# Altium PCB CH32M007E8U_FAN_R0.PcbDoc
Units mil, origin at the board's own origin, x right, y up, seen from the top; angles counter-clockwise.
Board outline 2119 x 1187.07 mil, 2 copper layers (Top Layer, Bottom Layer); 49 components, 34 nets, 149 pads, 107 vias.
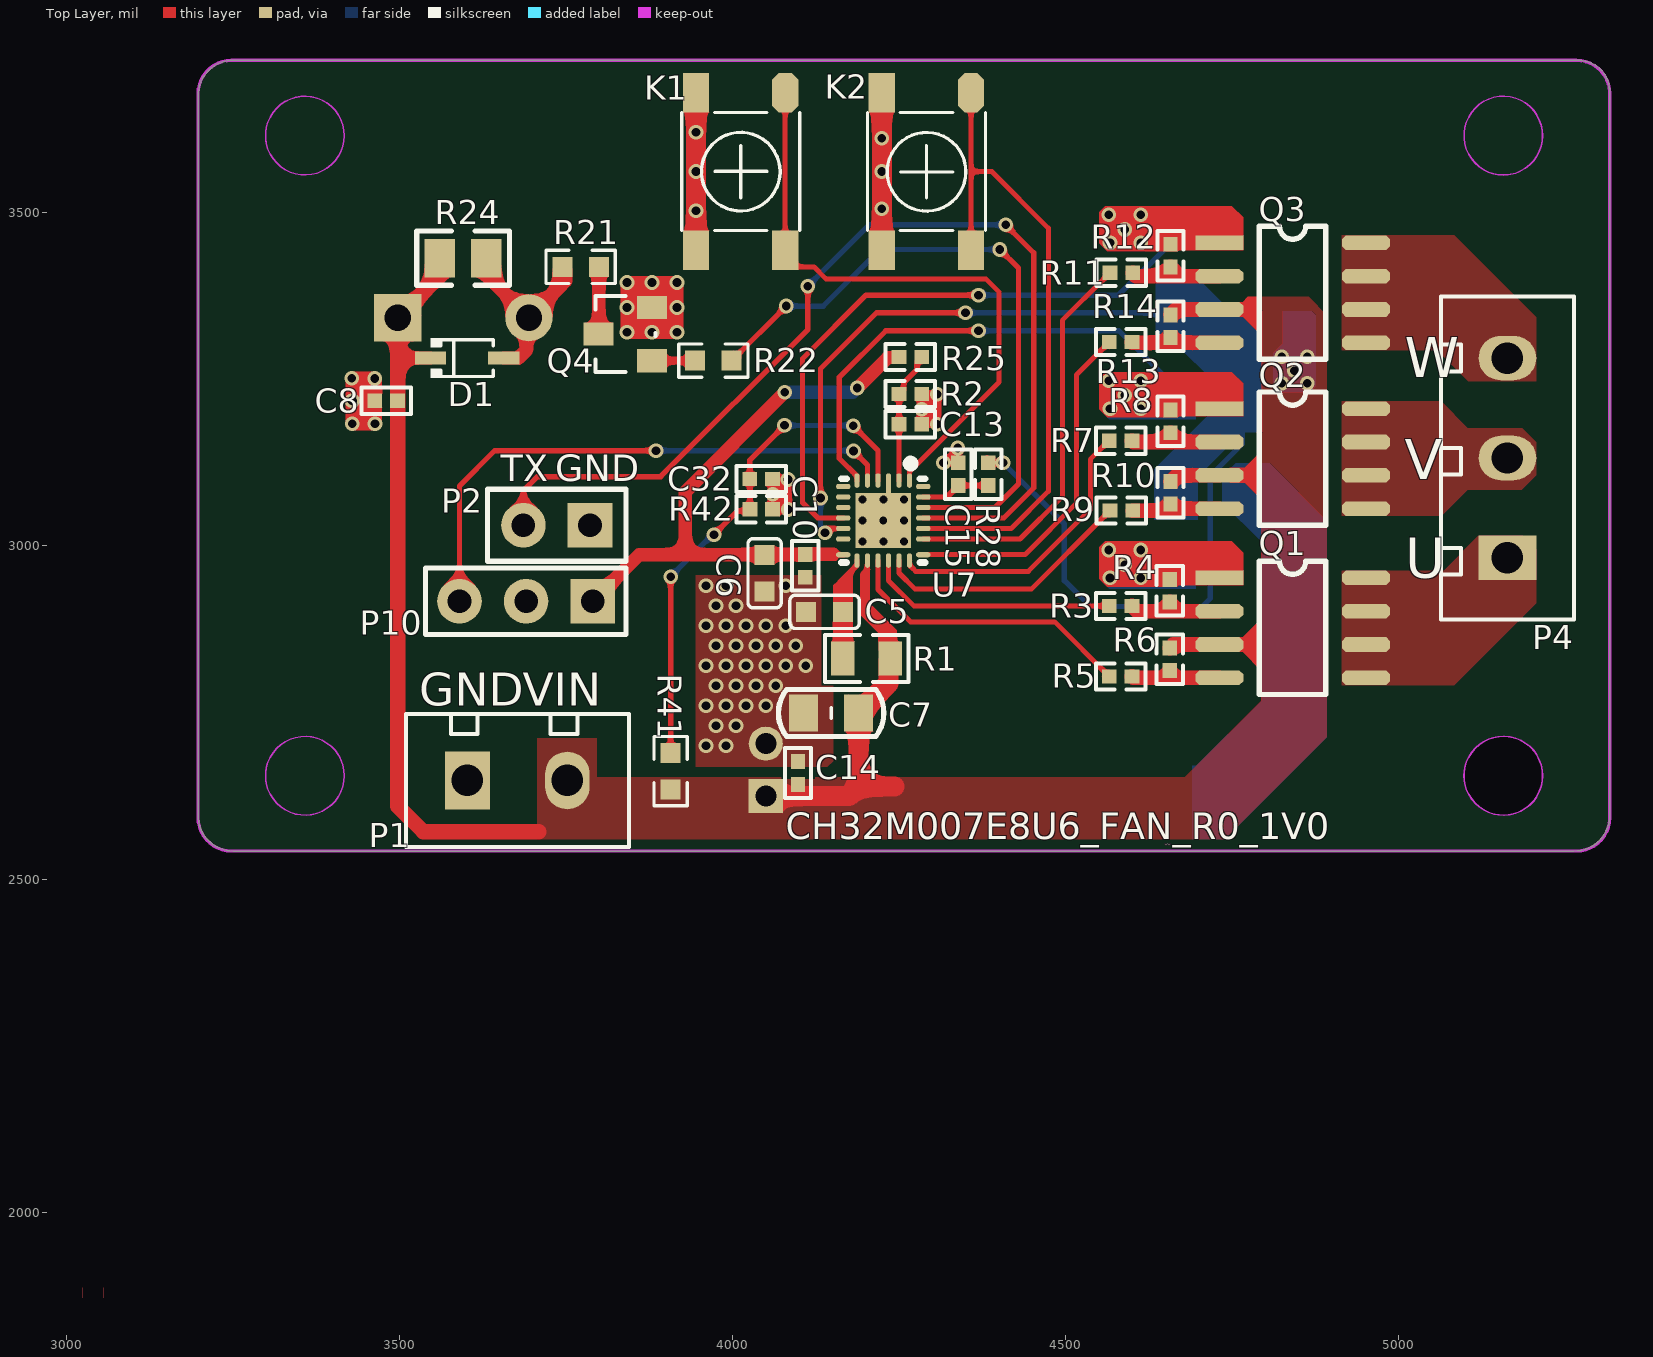
[diagram p0: Top Layer view]
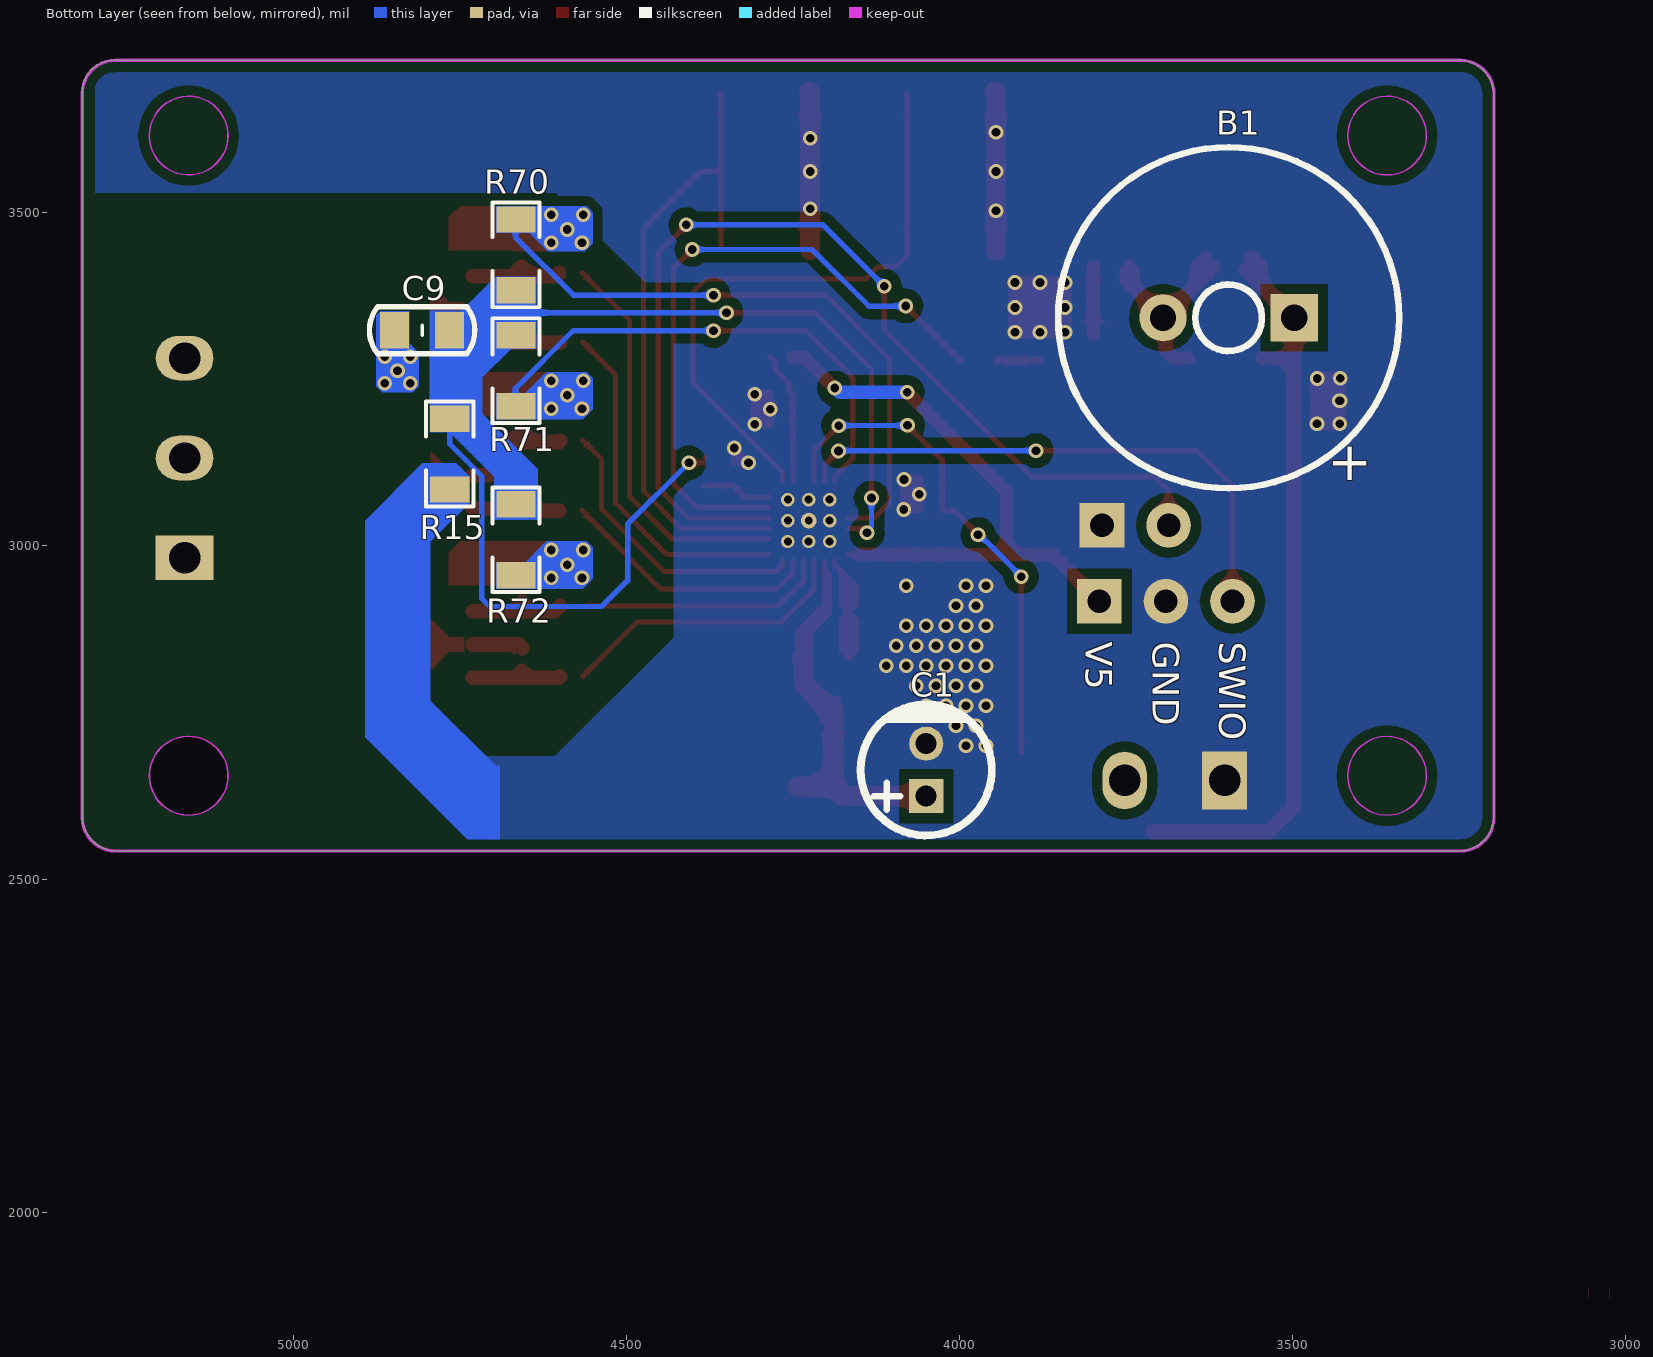
[diagram p1: Bottom Layer view, seen from below]

## Layer stack, top to bottom
Top Solder: solder mask 0.4, Solder Resist, Dk 3.5
Top Layer: signal copper 1.4
Dielectric1: dielectric 12.6, FR-4, Dk 4.8
Bottom Layer: signal copper 1.4
Bottom Solder: solder mask 0.4, Solder Resist, Dk 3.5

## Board outline
3197.63,2594.97 ccw(c3250.64,2595) 3250.64,2541.99 3250.64,2542 5263.61,2542 5263.61,2541.99 ccw(c5263.61,2595) 5316.62,2595 5316.62,3681.04 ccw(c5268.61,3681.04) 5268.61,3729.05 3250.64,3729.05 ccw(c3250.64,3676.04) 3197.63,3676.04
cut-out: 5097.49,2655.17 ccw(c5156.55,2655.17) 5156.55,2596.12 ccw(c5156.55,2655.17) 5215.6,2655.17 ccw(c5156.55,2655.17) 5156.55,2714.23 ccw(c5156.55,2655.17)

## Design rules (kind name [scope] priority, off if disabled: settings)
Clearance Clearance_1 [InPolygon] p1: gap=15 ignorepadtopadclearanceinfootprint=FALSE except(0: Arc-Hole Track-Hole SMDPad-Hole THPad-Hole Via-Hole Fill-Hole Poly-Hole Region-Hole Text-Hole)
Clearance [All] p2: gap=6 ignorepadtopadclearanceinfootprint=FALSE except(0: Arc-Hole Track-Hole SMDPad-Hole THPad-Hole Via-Hole Fill-Hole Poly-Hole Region-Hole Text-Hole)
DiffPairsRouting [All] p1: maxlimit=10 minlimit=10 mostfreqgap=10 toplayer_minwidth=15 toplayer_maxwidth=15 toplayer_prefwidth=15 bottomlayer_minwidth=15 bottomlayer_maxwidth=15 bottomlayer_prefwidth=15 substack1={825F90D1-6AF3-4863-A212-544127A36AD2} toplayer_{825f90d1-6af3-4863-a212-544127a36ad2}_minwidth=15 toplayer_{825f90d1-6af3-4863-a212-544127a36ad2}_maxwidth=15 toplayer_{825f90d1-6af3-4863-a212-544127a36ad2}_prefwidth=15 bottomlayer_{825f90d1-6af3-4863-a212-544127a36ad2}_minwidth=15 bottomlayer_{825f90d1-6af3-4863-a212-544127a36ad2}_maxwidth=15 bottomlayer_{825f90d1-6af3-4863-a212-544127a36ad2}_prefwidth=15 maxuncoupledlength=500
PolygonConnect [All] p1: connectstyle=Direct reliefconductorwidth=10 reliefentries=4 polygonreliefangle="90 Angle" airgapwidth=10
RoutingVias [All] p1: holewidth=13 width=22 viastyle="Through Hole" minholewidth=13 minwidth=22 maxholewidth=28 maxwidth=50
SolderMaskExpansion [All] p1: expansion=4 istentingtop=FALSE
Width [All] p1: maxlimit=100 minlimit=6 preferedwidth=10 substack1={825F90D1-6AF3-4863-A212-544127A36AD2} minimp=50.000000 maximp=50.000000 favimp=50.000000
29 further rules are at their usual default settings.

## Components (designator, comment, footprint, x,y, rotation, side; value= is the part's Value field where it differs from the comment)
B1 "BUZZER" M_BUZZER12550 3594.93,3343.42 r0 bottom
C1 "47uF/35V" M_C_RB_D5F2 4048,2664 r90 bottom
C5 "2.2uF/25V" M_C0603 4138,2899 r180 top
C6 "10uF" M_C0603 4050,2959 r270 top
C7 "10uF/25V" M_C0805 4150.93,2750 r180 top
C8 "0.1uF/25V" M_C0402- 3479.14,3217.63 r180 top
C9 "1uF/50V" M_C0805 4809.52,3323 r180 bottom
C10 "0.1uF" M_C0402- 4109.37,2969.14 r270 top
C13 "0.1uF" M_C0402- 4267.78,3183.11 r0 top
C14 "0.1uF/50V" M_C0402- 4098,2660 r90 top
C15 "1nF" M_C0402- 4339,3107 r270 top
C32 "0.1uF" M_C0402- 4043.69,3100.93 r0 top
D1 "4148" SOD-323 3601.52,3282 r180 top
K1 "KH-6X6X8H-STM" KEY2-SMD 4010.13,3561.22 r270 top
K2 "KH-6X6X8H-STM" KEY2-SMD 4288.98,3561.11 r270 top
P1 "POWER" WJ15EDGRC3.81-2 3677,2643 r0 top
P2 "TXD" HDR2.54-LI-2P 3786,3031 r270 top
P4 "MHDR1X3" WJ15EDGRC3.81-3 5163,3132 r90 top
P10 "SWD" HDR2.54-LI-3P 3640,2917 r270 top
Q1 "NP4606SR" SOP8 4730.52,2952 r270 top
Q2 "NP4606SR" SOP8 4730.52,3206 r270 top
Q3 "NP4606SR" SOP8 4730.52,3455 r270 top
Q4 "S8050" SOT23 3839,3318 r90 top
R1 "100 Ω" M_R0805- 4201,2831 r0 top
R2 "1k 1%" M_R0402- 4266.14,3226.63 r180 top
R3 "22 Ω" M_R0402- 4581.65,2908.63 r180 top
R4 "20k" M_R0402- 4657.52,2932 r270 top
R5 "22 Ω" M_R0402- 4581.65,2802.63 r180 top
R6 "20k" M_R0402- 4657.52,2829 r270 top
R7 "22 Ω" M_R0402- 4581.65,3156.63 r180 top
R8 "20k" M_R0402- 4658.52,3186 r270 top
R9 "22 Ω" M_R0402- 4582.65,3051.63 r180 top
R10 "20k" M_R0402- 4658.52,3079 r270 top
R11 "22 Ω" M_R0402- 4582.65,3408.63 r180 top
R12 "20k" M_R0402- 4658.52,3435 r270 top
R13 "22 Ω" M_R0402- 4581.65,3304.63 r180 top
R14 "20k" M_R0402- 4658.52,3329 r270 top
R15 "0R100/1W" M_R1206- 4766,3136.85 r90 bottom
R21 "100Ω" M_R0603 3799.02,3420 r180 top
R22 "1kΩ" M_R0603 3944,3277 r0 top
R24 "2KΩ" M_R0805 3628.52,3432 r180 top
R25 "15k 1%" M_R0402- 4266,3282 r180 top
R28 "10k" M_R0402- 4385,3107 r270 top
R41 "4.7k 1%" M_R0603 3906,2689 r270 top
R42 "1k 1%" M_R0402- 4042.22,3053.63 r180 top
R70 "0R100/1W" M_R1206- 4666.52,3436 r90 bottom
R71 "0R100/1W" M_R1206- 4664.52,3264 r270 bottom
R72 "0R100/1W" M_R1206- 4664.52,3010.3 r270 bottom
U7 "CH32M007E8U6" QFN26C_3X3 4226.12,3038.04 r180 top

## Footprints (in the part's own frame and the unit in brackets; to place one, negate y for a bottom-side part, rotate by r counter-clockwise, add the part's x,y. Pads: shape width x height; smd on the part's side, far side on the other; paste and mask are expansions set on the pad)
HDR2.54-LI-2P [mm]
  rect 1.7x1.7 hole 0.9: 1(0,0)
  round 1.7 hole 0.9: 2(0,-2.54)
  silkscreen extent -1.37,-3.91 1.37,1.37, body extent -1.27,-3.81 1.27,1.27, height 8.5
HDR2.54-LI-3P [mm]
  rect 1.7x1.7 hole 0.9: 1(0,3.81)
  round 1.7 hole 0.9: 2(0,1.27) 3(0,-1.27)
  silkscreen extent -1.27,-2.57 1.27,5.08
KEY2-SMD [mm]
  oct 1.5x1 smd: 1(-3.023,1.749)
  rect 1.5x1 smd: 2(2.977,1.749) 3(-3.023,-1.651) 4(2.977,-1.651)
  silkscreen extent -2.27,-2.2 2.23,2.3
M_BUZZER12550 [mm]
  rect 1.8x1.8 hole 1: 1(-2.477,0.023)
  round 1.8 hole 1: 2(2.523,0.023)
  silkscreen extent -6.48,-6.48 6.52,6.52
M_C0402- [mm]
  rect 0.566x0.54 smd mask+0.051: 1(-0.454,-0.009) 2(0.412,-0.009)
  silkscreen extent -0.97,-0.51 0.92,0.49
M_C0603 [mil]
  rect 30x30 smd: 1(-27.5,-2) 2(27.5,-2)
  silkscreen extent -52,-27 52,23
M_C0805 [mm]
  rect 1.1x1.4 smd: 1(-0.972,0.019) 2(1.128,0.019)
  silkscreen extent -1.93,-0.88 2.09,0.92
M_C_RB_D5F2 [mm]
  rect 1.3x1.3 hole 0.8: 1(-1.005,0.045)
  round 1.3 hole 0.8: 2(0.995,0.045)
  silkscreen extent -2.5,-2.45 2.49,2.55
M_R0402- [mm]
  rect 0.566x0.54 smd mask+0.051: 1(-0.454,-0.035) 2(0.412,-0.035)
  silkscreen extent -0.97,-0.53 0.92,0.46
M_R0603 [mil]
  rect 30x30 smd: 1(-0.5,1) 2(54.5,1)
  silkscreen extent -25,-24 79,26
M_R0805 [mm]
  rect 1.16x1.47 smd: 1(-0.051,0) 2(1.729,0)
  silkscreen extent -0.93,-1.04 2.61,1.03
M_R0805- [mm]
  rect 0.9x1.3 smd: 1(-0.9,0) 2(0.9,0)
  silkscreen extent -1.57,-0.89 1.6,0.89, body extent -1,-0.63 1,0.63, height 0.5
M_R1206- [mm]
  rect 1x1.5 smd: 1(-1.325,-0.025) 2(1.375,-0.025)
  silkscreen extent -1.97,-0.93 2.03,0.87
QFN26C_3X3 [mm]
  rect 2.1x2.1 smd mask+0.051: 0(0,0)
  round 0.6 hole 0.3 mask+0.051: 0(0,0)
  oval 0.2x0.55 smd mask+0.051: 1(-1,-1.525) 2(-0.6,-1.525) 4(0.2,-1.525) 5(0.6,-1.525) 6(1,-1.525) 14(1,1.525) 15(0.6,1.525) 16(0.2,1.525) 17(-0.2,1.525) 18(-0.6,1.525) 19(-1,1.525)
  oval 0.2x1 smd mask+0.051: 3(-0.2,-1.3)
  oval 0.55x0.2 smd mask+0.051: 7(1.525,-1.3) 8(1.525,-0.9) 9(1.525,-0.5) 10(1.525,-0.1) 11(1.525,0.3) 12(1.525,0.7) 13(1.525,1.3) 20(-1.525,1.3) 21(-1.525,0.7) 22(-1.525,0.3) 23(-1.525,-0.1) 24(-1.525,-0.5) 25(-1.525,-0.9) 26(-1.525,-1.3)
  silkscreen extent -1.6,-2.33 1.6,1.6
SOD-323 [mil]
  rect 47.24x20 smd: 1(-55,0) 2(55,0)
  silkscreen extent -39,-30 55,30
SOP8 [mil]
  rect 22x72 smd: 1(0,0)
  oct 22x72 smd: 2(50,0) 3(100,0) 4(150,0) 5(150,220) 6(100,220) 7(50,220) 8(0,220)
  silkscreen extent -25,60 175,160
SOT23 [mil]
  rect 35x45 smd: 1(-40,-40) 2(40,-40) 3(0,40)
  silkscreen extent -57,-45 57,45
WJ15EDGRC3.81-2 [mm]
  rect 1.7x2.2 hole 1.2: 1(-1.905,0.127)
  oval 1.7x2.2 hole 1.2: 2(1.905,0.127)
  silkscreen extent -4.25,-2.41 4.25,2.67
WJ15EDGRC3.81-3 [mm]
  rect 1.7x2.2 hole 1.2: 1(-3.81,0)
  oval 1.7x2.2 hole 1.2: 2(0,0) 3(3.81,0)
  silkscreen extent -6.15,-2.54 6.15,2.54

## Part data
C1: library part "CAPACITOR POL_2", "Capacitor"
C5 C6 C7 C8 C9 C10 C13 C14 C15 C32: library part "Cap Semi", "Capacitor (Semiconductor SIM Model)", LatestRevisionDate=17-Jul-2002, LatestRevisionNote="Re-released for DXP Platform.", PackageReference=C0805, Published=8-Jun-2000, Publisher="Altium Limited"
D1: library part "Diode 1N4148", "High Conductance Fast Diode", Code_JEDEC=DO-204-AH, ComponentLink1Description="Manufacturer Link", ComponentLink1URL=http://www.fairchildsemi.com/, ComponentLink2Description=Datasheet, ComponentLink2URL=http://www.fairchildsemi.com/ds/1N%2F1N4148.pdf, DatasheetDocument=1997, LatestRevisionDate=17-Jul-2002, LatestRevisionNote="Re-released for DXP Platform.", PackageReference=DO-35, Published=8-Jun-2000, Publisher="Altium Limited"
K1 K2: Contact Current=50mA, IP Rating=-, JLCPCB Part Class="Extended Part", Voltage Rating (DC)=12V, Add into BOM=yes, Convert to PCB=yes, Datasheet=https://atta.szlcsc.com/upload/public/pdf/source/20210608/C2837534_94EAC7D8AFBB996E2814FACF50FEEF85.pdf, Device=KH-6X6X8H-STM, LCSC Part Name=KH-6X6X8H-STM, Manufacturer Part=KH-6X6X8H-STM, Mechanical Life=80000, Name==''Part, Operating Force=-, Operating Temperature=-, Power Rating=-, Supplier=LCSC, Supplier Footprint=SMD, Supplier Part=C2837534, Switch Height=-, Switch Length=6mm, Switch Width=6mm, Symbol=KH-6X6X8H-STM, Voltage Rating (AC)=-, With Lamp=-
P1 P2: library part 2PIN
P4: "Header, 3-Pin", LatestRevisionDate=17-Jul-2002, LatestRevisionNote="Re-released for DXP Platform.", Publisher="Altium Limited"
P10: library part 3PIN
Q1 Q2 Q3: library part NP9926BSR-G, Continuous Drain Current (Id)=6A, Drain Source Voltage (Vdss)=20V, Gate Threshold Voltage (Vgs(th)@Id)=700mV@250uA, Input Capacitance (Ciss@Vds)=900pF@10V, JLCPCB Part Class="Extended Part", Power Dissipation (Pd)=1.25W, Reverse Transfer Capacitance (Crss@Vds)=100pF@10V, Add into BOM=yes, Convert to PCB=yes, Datasheet=https://atta.szlcsc.com/upload/public/pdf/source/20220426/45EDAE8AA532D945771DBC41E7CE2370.pdf, Device=NP9926BSR-G, Manufacturer Part=NP9926BSR-G, Supplier=LCSC, Supplier Footprint=SOP-8, Supplier Part=C2991134, Symbol=NP9926BSR-G, Total Gate Charge (Qg@Vgs)=12nC@4.5V
Q4: library part NPN1
R1 R2 R3 R4 R5 R6 R7 R8 R9 R10 R11 R12 R13 R14 R15 R21 R22 R24 R25 R28 R41 R42 R70 R71 R72: library part Res2, "Resistor", LatestRevisionDate=17-Jul-2002, LatestRevisionNote="Re-released for DXP Platform.", PackageReference=AXIAL-0.4, Published=8-Jun-2000, Publisher="Altium Limited"
U7: "RISC-V MCU, 48MHz, OPA/CMP/UART/I2C, 24V P/NMOS gate driver for motor"

## Via types
v1: diameter 22, hole 13, Top Layer to Bottom Layer, tented both sides, 99 vias
v2: diameter 20, hole 12, Top Layer to Bottom Layer, tented both sides, 8 vias

## Nets (pads, with @x,y where several pads share a name; then routed paths per layer and width w, separated by ;. In a path a pad name is that pad's centre, name@x,y a point inside that pad or via, vN(x,y) a via of type N, cw(c..) or ccw(c..) an arc to the next point about the centre after c; other vN are vias at no path point)
ADC_Vbus: C32.1 R41.1 R42.2 U7.4 | length 774
  Top Layer w8: R41.1 v1(3907,2954) ; v1(3972,3017) 4007.55,3052.55 4023.55,3052.55 R42.2 4025.91,3055.09 4025.91,3100.48 C32.1 4025.82,3128.82 v1(4078,3181) ; v1(4181,3180.5) 4218.24,3143.26 U7.4
  Bottom Layer w8: v1(3907,2954) 3970,3017 v1(3972,3017) ; v1@4078,3180.75 4180.75,3180.75 v1(4181,3180.5)
BEEP_CTRL: R22.2 U7.24 | length 992.8
  Top Layer w8: R22.2 v1(4080.75,3360.25) ; U7.24 4393.72,3057.72 4429,3093 4429,3417 v1(4401,3445)
  Bottom Layer w8: v1@4080.75,3360 4136,3360 4221,3445 v1(4401,3445)
CMP1_N0: C15.2 R28.2 U7.25 | length 104.9
  Top Layer w8: U7.25 4321.82,3073.47 4338.63,3090.28 C15.2 R28.2
CMP1_P0: C13.1 R2.2 R25.1 U7.2 | length 200
  Top Layer w8: U7.2 4249.8,3098.14 4249.8,3182.61 C13.1 R2.2 4250.43,3228 4257.06,3234.63 4257.06,3245.05 4276.73,3264.73 4276.73,3276.74 4283.36,3283.37 R25.1
GND: C1.2 C5.2 C6.2 C7.2 C8.2 C10.2 C13.2 C14.2 C15.1 C32.2 K1.3 K1.4 K2.3 K2.4 P1.1 P2.1 P10.2 Q4.2 R2.1 R15.1 R42.1 U7.0 U7.3 | length 1677.5
  Top Layer w8: v1(4316.49,3124.86) 4316.49,3125.18 4338,3146.68 v1(4338,3147) 4338.31,3146.68 C15.1@4338.31,3125.18 ; v1@4316.81,3125.18 C15.1@4338.31,3125.18 ; C15.1 C15.1@4338.31,3125.18
  Top Layer w12: C32.2 C32.2@4060.08,3100.39 ; v1(4083.55,3054.7) v1@4083.49,3054.76 ; C32.2@4060.08,3100.39 R42.1 4060.32,3054.76 v1@4083.49,3054.76 ; C32.2@4060.08,3100.39 4060.28,3100.2 4082.8,3100.2 v1(4083.18,3099.82) 4083.36,3099.64 4083.36,3054.89 v1@4083.49,3054.76 ; 4295.63,3182.7 4295.63,3227.96 ; 4295.63,3182.7 C13.2 C13.2 v1(4284,3205.37) R2.1 R2.1 4295.63,3227.96 ; 4295.63,3182.7 4307.21,3182.7 v1(4307.26,3182.65) v1(4307.26,3227.91) 4307.21,3227.96 4295.63,3227.96
  Top Layer w20: v1(3428.55,3251.78) v1@3428.74,3251.6 ; v1@3428.74,3251.6 3428.84,3251.49 3428.84,3183.92 v1(3429.14,3183.63) v1(3463.14,3183.63) 3463.03,3183.74 3463.03,3251.31 v1(3462.92,3251.41) 3462.74,3251.6 v1@3428.74,3251.6 ; v1(3841.52,3358) Q4.2@3860.26,3358 ; v1(3841.52,3358) v1(3841.52,3320.52) 3860.26,3320.52 ; v1(3841.52,3358) v1(3841.52,3395.48) 3860.26,3395.48 ; 3860.26,3320.52 v1(3879,3320.52) ; 3860.26,3320.52 Q4.2@3860.26,3358 ; Q4.2@3860.26,3358 Q4.2 ; Q4.2@3860.26,3358 3860.26,3395.48 ; 3860.26,3395.48 v1(3879,3395.48) ; v1(3879,3320.52) 3897.74,3320.52 ; v1(3879,3320.52) Q4.2 ; Q4.2 Q4.2@3897.74,3358 ; Q4.2 v1(3879,3395.48) ; v1(3879,3395.48) 3897.74,3395.48 ; 3897.74,3320.52 v1(3916.48,3320.52) v1(3916.48,3358) ; 3897.74,3320.52 Q4.2@3897.74,3358 ; Q4.2@3897.74,3358 v1(3916.48,3358) ; Q4.2@3897.74,3358 3897.74,3395.48 ; 3897.74,3395.48 v1(3916.48,3395.48) v1(3916.48,3358)
  Top Layer w30: K1.4@3945.16,3444.02 v1(3945.16,3562.13) 3945.16,3680.24 K1.3@3947.14,3682.22 ; K2.4 v1(4224,3562) K2.3 K2.3@4225.98,3682.09
  other v1: 3960,2700 3990,2700 3975,2730 4005,2730 3960,2760 3990,2760 4020,2760 4050,2760 3975,2790 4005,2790 4035,2790 4065,2790 3960,2820 3990,2820 4020,2820 4050,2820 4080,2820 4110,2820 3975,2850 4005,2850 4035,2850 4065,2850 4095,2850 3960,2880 3990,2880 4020,2880 4050,2880 4080,2880 3975,2910 4005,2910 3960,2940 3990,2940 4080,2940 4060.12,3077.66 3428.55,3217.78 3429.51,3218 3945.16,3503.07 4223.98,3506.11 4223.98,3612.11 3945.16,3621.18
  other v2: 4194.62,3006.54 4226.12,3006.54 4257.62,3006.54 4194.62,3038.04 4257.62,3038.04 4194.62,3069.54 4226.12,3069.54 4257.62,3069.54
I1_shunt: C9.2 R15.2 R28.1 R70.1 R71.1 R72.1 U7.11 | length 1735.6
  Top Layer w8: v1(4132,3072) 4132,3266 4216,3350 v1(4349.63,3350) ; v1(4138.61,3019.61) 4145.23,3026.23 U7.11 ; R28.1@4381.86,3132.37 R28.1@4381.93,3132.44 ; R28.1 v1(4405.86,3124.86)
  Bottom Layer w8: v1(4132,3072) 4132,3030.02 4138.61,3023.4 v1(4138.61,3019.61) ; v1(4349.63,3350) 4650.99,3350 4665.52,3350 ; v1(4405.86,3124.86) 4406.14,3124.86 4498,3033 4498,2948 4537,2909 4705,2909 4717,2921 4717,3105 4765,3153 R15.2
  Bottom Layer w30: R71.1@4650.99,3311 R71.1@4650.99,3316.15 ; 4650.99,3350 4650.99,3379.17 4655.67,3383.85 R70.1 ; R71.1 4665.52,3350 ; R70.1@4675.36,3383.85 4680.04,3379.17 4680.04,3350
KEY1: K1.1 K1.2 U7.1 | length 927.4
  Top Layer w7.5: K1.1 K1.2 4079,3434.94 4094.94,3419 4122.16,3419 4139.91,3401.25 4139.91,3401 4380,3401 4400,3381 4400,3246 4265.55,3111.55 4265.55,3098.15 U7.1
KEY2: K2.1 K2.2 U7.22 | length 993.5
  Top Layer w7.5: U7.22 4418.23,3026.23 4474,3082 4474,3477 4389,3562 4357.86,3562 ; K2.2 4357.86,3562 ; K2.1 4357.86,3562
M1_CH1_H: R5.2 U7.16 | length 444.6
  Top Layer w7.5: U7.16 4218.25,2934.75 4267,2886 4483.44,2886 R5.2
M1_CH1_L: R3.2 U7.17 | length 377.2
  Top Layer w7.5: U7.17 4234.07,2977.93 4234.07,2947.93 4272,2910 R3.2
M1_CH2_H: R9.2 U7.18 | length 394.7
  Top Layer w7.5: U7.18 4249.75,2959.25 4274,2935 4448.44,2935 4559.05,3045.61 4559.05,3046.12 4565.93,3053 R9.2
M1_CH2_L: R7.2 U7.19 | length 435.7
  Top Layer w7.5: U7.19 4265.5,2971.21 4274.71,2962 4444,2962 4537,3055 4537,3130.07 4564.93,3158 R7.2
M1_CH3_H: R13.2 U7.20 | length 524.6
  Top Layer w7.5: U7.20 4438.86,2986.86 4516,3064 4516,3256.56 4558.05,3298.61 4558.05,3299.12 4564.93,3306 R13.2
M1_CH3_L: R11.2 U7.21 | length 601
  Top Layer w7.5: U7.21 4431.48,3010.48 4495,3074 4495,3338.56 4559.05,3402.61 4559.05,3403.12 4565.93,3410 R11.2
M1_Iu: Q1.1 R4.1 R72.2
  other v1: 4566.52,2952 4612.52,2952 4588.52,2972 4564.52,2994 4612.52,2994
M1_Iv: Q2.1 R8.1 R71.2 U7.6 | length 838.2
  Top Layer w8: U7.6 4186.74,3104.84 4160,3131.59 4160,3253 4230,3323 v1(4369,3323)
  Top Layer w22: R8.1 4657.38,3203.86 4659.52,3206 Q2.1
  Bottom Layer w8: v1(4369,3323) 4580,3323 4666.52,3236.48 R71.2@4666.52,3209.85
  other v1: 4566.52,3206 4612.52,3206 4588.52,3226 4564.52,3248 4612.52,3248
M1_Iw: Q3.1 R12.1 R70.2 U7.10 | length 1086.5
  Top Layer w8: U7.10 4128.02,3041.98 4105,3065 4105,3281 4200.5,3376.5 v1(4369,3376.5)
  Top Layer w22: R12.1 4657.38,3452.86 4659.52,3455 Q3.1
  Bottom Layer w8: v1(4369,3376.5) 4579.5,3376.5 4666.02,3463.02 R70.2@4666.02,3489.65 ; R70.2@4636.52,3475 4650.37,3475 R70.2 R70.2@4666.02,3489.65 ; R70.2@4686.52,3475 4680.66,3475 R70.2@4666.02,3489.65
  other v1: 4566.52,3455 4612.52,3455 4588.52,3475 4564.52,3497 4612.52,3497
M1_U: P4.1 Q1.5 Q1.6 Q1.7 Q1.8
M1_V: P4.2 Q2.5 Q2.6 Q2.7 Q2.8
M1_W: P4.3 Q3.5 Q3.6 Q3.7 Q3.8
NetB1_2: B1.2 D1.1 R21.2 R24.1 | length 375
  Top Layer w20: R24.1@3618.52,3418.26 3643.35,3393.43 ; R24.1 3643.35,3419.17 3643.35,3393.43 ; D1.1 3678.81,3282 3690.53,3293.72 3690.53,3338.76 B1.2 ; 3643.35,3393.43 B1.2 ; B1.2 3739.52,3387.75 ; 3739.52,3387.75 3749.52,3397.75 3749.52,3414 R21.2 3739.52,3414 3739.52,3387.75
NetC5_1: C5.1 R1.1 U7.14 | length 436
  Top Layer w8: U7.14 4186.76,2971.24 4176.38,2960.86 ; C5.1 C5.1@4165.57,2900.93 ; C5.1 4154.5,2890 4154.5,2842.07 R1.1 ; C5.1 C5.1@4166,2901.5 ; C5.1 4155,2911.5 4155,2939.48 4166,2950.48 ; R1.1 4176.5,2841.93 4176.5,2890 C5.1@4165.57,2900.93 ; R1.1 C5.1@4165.57,2900.93 ; C5.1@4166,2901.5 4176.38,2911.88 4176.38,2960.86 ; C5.1@4166,2901.5 4166,2950.48 ; 4166,2950.48 4176.38,2960.86
NetQ1_2: Q1.2 R3.1 R4.2 | length 190.1
  Top Layer w22: R3.1 4599.52,2909.76 4607.28,2902 4642.13,2902 ; 4686.32,2902 4670.17,2902 ; Q1.2 4670.17,2902 ; 4642.13,2902 4670.17,2902 ; 4642.13,2902 4655.91,2915.78 R4.2 4656.38,2915.78 4670.17,2902
NetQ1_4: Q1.4 R5.1 R6.2 | length 167.3
  Top Layer w22: R5.1 4599.52,2803.76 4601.28,2802 4645.13,2802 ; 4671.52,2802 4667.17,2802 ; Q1.4 4667.17,2802 ; 4645.13,2802 4655.91,2812.78 R6.2 4656.38,2812.78 4667.17,2802 ; 4645.13,2802 4667.17,2802
NetQ2_2: Q2.2 R7.1 R8.2 | length 187.1
  Top Layer w22: R7.1 4599.52,3157.76 4601.28,3156 4643.13,3156 ; 4686.82,3156 4671.17,3156 ; Q2.2 4671.17,3156 ; 4643.13,3156 4671.17,3156 ; 4643.13,3156 4656.91,3169.78 R8.2 4657.38,3169.78 4671.17,3156
NetQ2_4: Q2.4 R9.1 R10.2 | length 164.5
  Top Layer w22: R9.1 R10.2@4647.13,3053 ; 4673.52,3056 R10.2@4664.17,3056 ; Q2.4 R10.2@4664.17,3056 ; R10.2@4647.13,3053 4651.58,3053 4654.58,3056 R10.2@4664.17,3056 ; R10.2@4647.13,3053 4656.91,3062.78 R10.2 4657.38,3062.78 R10.2@4664.17,3056
NetQ3_2: Q3.2 R11.1 R12.2 | length 187.3
  Top Layer w22: R11.1 4600.52,3409.76 4605.28,3405 4643.13,3405 ; 4686.82,3405 4671.17,3405 ; Q3.2 4671.17,3405 ; 4643.13,3405 4656.91,3418.78 R12.2 4657.38,3418.78 4671.17,3405 ; 4643.13,3405 4671.17,3405
NetQ3_4: Q3.4 R13.1 R14.2 | length 162.4
  Top Layer w22: R13.1 4599.52,3305.76 4600.28,3305 R14.2@4649.13,3305 ; 4673.52,3305 R14.2@4665.17,3305 ; Q3.4 R14.2@4665.17,3305 ; R14.2@4649.13,3305 4656.91,3312.78 R14.2 4657.38,3312.78 R14.2@4665.17,3305 ; R14.2@4649.13,3305 R14.2@4665.17,3305
NetQ4_1: Q4.1 R22.1 | length 64.5
  Top Layer w12: Q4.1 R22.1
NetQ4_3: Q4.3 R21.1 | length 101.9
  Top Layer w20: R21.1@3798.5,3416.98 R21.1@3799,3417.48 ; Q4.3 3799.26,3318.26 3799.26,3418.74 R21.1
SWIO: P10.3 U7.5 | length 839.8
  Top Layer w8: P10.3 3590,3090 3643,3143 v1(3885,3143) ; v1(4181.5,3142.5) 4202.43,3121.57 4202.43,3098.14 U7.5
  Bottom Layer w8: v1(3885,3143) 4181,3143 v1(4181.5,3142.5)
UART1_TX: P2.2 U7.23 | length 1576.2
  Top Layer w8: P2.2 3686,3083 3707,3104 3892,3104 4113,3325 v1(4113,3390) ; U7.23 4406.98,3041.98 4452,3087 4452,3440 v1(4410,3482)
  Bottom Layer w8: v1(4113,3390) 4205,3482 v1(4410,3482)
V5: C6.1 C10.1 P10.1 R25.2 U7.13 | length 1021.6
  Top Layer w8: C10.1@4109.08,2986.92 U7.13@4159.25,2986.92 ; C10.1@4109.08,2986.92 4114.46,2981.54 4154,2981.54 U7.13@4159.32,2986.86 ; C10.1@4109.08,2986.92 C10.1 4109,2987.37 4115.63,2994 4152.17,2994 U7.13@4159.25,2986.92 ; U7.13@4159.25,2986.92 U7.13@4159.32,2986.86 ; U7.13@4159.25,2986.92 4166.02,2986.92 U7.13 U7.13@4159.32,2986.86
  Top Layer w20: P10.1 3860,2987 3929,2987 ; v1(4078.5,3230.5) 3929,3081 3929,2987 ; C10.1 3929,2987 ; v1(4187,3237) 4232.74,3282.74 4249.15,3282.74 R25.2
  Bottom Layer w20: v1(4078.5,3230.5) 4180.5,3230.5 v1(4187,3237)
Vin: B1.1 C1.1 C7.1 C8.1 C9.1 C14.1 D1.2 P1.2 Q1.3 Q2.3 Q3.3 R1.2 R6.1 R10.1 R14.1 R24.2 R41.2 U7.15 | length 2258.9
  Top Layer w7.5: U7.15 4202.5,2965 ; 4195,2909 4195,2898 4222.47,2870.53 4222.47,2844.97 R1.2@4223,2844.43 ; 4195,2909 4223,2881 R1.2@4223,2844.43 ; 4195,2909 4195,2957.5 4202.5,2965 ; 4202.5,2965 4202.5,2912.5 4236.43,2878.57 ; R1.2@4223,2844.43 R1.2 ; R1.2 4243,2837.57 4243,2872 4236.43,2878.57 ; R1.2 4236.43,2878.57
  Top Layer w20: 3496,3282 3497.42,3282 D1.2 ; B1.1 B1.1@3500.52,3339.41
  Top Layer w22: R6.1 4656.38,2846.86 4661.52,2852 Q1.3 ; R10.1 4657.38,3096.86 4666.52,3106 Q2.3 ; R14.1 4657.38,3346.86 4665.52,3355 Q3.3
  Top Layer w23: B1.1@3490.79,3343.14 3493.79,3346.14 B1.1 ; R24.2 3549.1,3420.67 3549.1,3394.19 ; R24.2@3569.52,3414.6 3549.1,3394.19 ; 3709,2571 3535.67,2571 3497.42,2609.25 3497.42,3282 B1.1 ; B1.1 3549.1,3394.19
  Top Layer w30: C1.1 4174.84,2624.42 4189.21,2638.79 ; R1.2 4233.72,2828.28 4233.72,2793.76 4201.77,2761.81 4195.86,2761.81 4189.21,2755.16 C7.1 4189.21,2638.79 ; 4243.21,2638.79 4189.21,2638.79
  other v1: 4824.52,3244 4862.52,3244 4843.52,3263 4824.52,3284 4862.52,3284
pads on no net: U7.7 U7.8 U7.9 U7.12 U7.26

## Polygon pours and split planes (outlines as drawn)
Vin on Top Layer "NONET_L-01_P-001" (solid, pour order 0): 3707,2653 3707,2711 3796,2711 3796,2653 4679,2653 4793.48,2767.48 4793.54,3374.03 4864.49,3374.03 4892,3346.51 4892,2713 4739,2560 3707,2560
M1_V on Top Layer "NONET_L-01_P-001" (solid, pour order 1): 4914.52,3217 5063.51,3217 5103.51,3177 5185.52,3177 5206.52,3156 5206.52,3106 5184.51,3084 5103.51,3084 5064.51,3045 4914.52,3045
M1_W on Top Layer "NONET_L-01_P-001" (solid, pour order 2): 5206.52,3247 5206.52,3343 5083.52,3466 4914.52,3466 4914.52,3294 5057.52,3294 5104.51,3247
M1_U on Top Layer "NONET_L-01_P-001" (solid, pour order 3): 5119.51,3015 5186.52,3015 5206.52,2995 5206.52,2914 5083.52,2791 4914.52,2791 4914.52,2963 5067.52,2963
GND on Top Layer "NONET_L03_P-001" (solid, remove dead copper, pour order 10): 4150.9,2808 4133,2808 4133,2956 3945,2956 3945,2653 4127,2653 4150.99,2676.99
GND on Bottom Layer "NONET_L-01_P-001" (solid, pour order 4): 4720,2684 4607,2684 4429,2862 4429,3353 4606,3530 5296.94,3530 5296.94,3729.04 3198,3729.04 3198,2541.5 4462.52,2541 4686,2541 4720,2575

## Keep-outs
Keep-Out Layer:
  circle w2: c3358,2655 r59.18
  circle w2: c5157,2655 r59.18
  circle w2: c5157,3616 r59.18
  circle w2: c3358,3616 r59.18
  pour cut-out: 3358.12,3556.75 cw(c3358.12,3615.8) 3299.07,3615.8 cw(c3358.12,3615.8) 3358.12,3674.86 cw(c3358.12,3615.8) 3417.18,3615.8 cw(c3358.12,3615.8)
  pour cut-out: 5097.49,3615.8 ccw(c5156.55,3615.8) 5156.55,3556.75 ccw(c5156.55,3615.8) 5215.6,3615.8 ccw(c5156.55,3615.8) 5156.55,3674.86 ccw(c5156.55,3615.8)
  pour cut-out: 3358.12,2596.12 cw(c3358.12,2655.17) 3299.07,2655.17 cw(c3358.12,2655.17) 3358.12,2714.23 cw(c3358.12,2655.17) 3417.18,2655.17 cw(c3358.12,2655.17)
  pour cut-out: 3358.12,2596.12 cw(c3358.12,2655.17) 3299.07,2655.17 cw(c3358.12,2655.17) 3358.12,2714.23 cw(c3358.12,2655.17) 3417.18,2655.17 cw(c3358.12,2655.17)
  pour cut-out: 5156.55,2596.12 cw(c5156.55,2655.17) 5097.49,2655.17 cw(c5156.55,2655.17) 5156.55,2714.23 cw(c5156.55,2655.17) 5215.6,2655.17 cw(c5156.55,2655.17)
  lines w5: 3197.64,2592 ccw(c3247.64,2592) 3247.64,2542 5266.61,2542 ccw(c5266.61,2592) 5316.61,2592 5316.61,3679.04 ccw(c5266.61,3679.04) 5266.61,3729.04 3247.64,3729.04 ccw(c3247.64,3679.04) 3197.64,3679.04 3197.64,2592

## Other copper
Top Layer:
  region net GND: 4060.08,3099.73 4060.08,3055 4083.27,3055 4083.27,3099.73
  region net GND: 3841.52,3320.52 3916.48,3320.52 3916.48,3395.48 3841.52,3395.48
  region net GND: 4338.31,3146.68 4338.63,3146.37 4338.63,3124.86 4316.49,3124.86
  region net GND: 3428.55,3251.78 3428.76,3251.57 3428.76,3218 3462.92,3218 3462.92,3251.41
  region net Vin: 4202.5,2965 4195,2957.5 4195,2898 4222.47,2870.53 4222.47,2844.97 4236.43,2831 4243,2837.57 4243,2872 4202.5,2912.5
  region net NetC5_1: 4154.5,2890 4154.5,2842.07 4165.57,2831 4176.5,2841.93 4176.5,2901.38 4171.19,2906.69
  region net NetC5_1: 4155,2939.48 4155,2911.5 4165.5,2901 4176.38,2911.88 4176.38,2960.86
  region net GND: 3429.14,3183.63 3429.35,3183.84 3462.92,3183.84 3462.92,3218 3429.51,3218
  region net Vin: 4743.52,2863 4765.52,2863 4793.52,2891 4793.52,2813 4765.52,2841 4743.52,2841
  region net Vin: 4746.52,3117 4768.52,3117 4793.51,3142 4793.52,3070 4768.52,3095 4746.52,3095
  region net M1_Iw: 4562.52,3442 4550.52,3454 4550.52,3501 4559.52,3510 4749.52,3510 4766.52,3493 4766.52,3444 4669.52,3444 4667.52,3442
  region net M1_Iv: 4562.52,3193 4550.52,3205 4550.52,3252 4559.52,3261 4749.52,3261 4766.52,3244 4766.52,3195 4669.52,3195 4667.52,3193
  region net Vin: 4743.52,3366 4765.52,3366 4773.51,3374 4794,3374 4794,3315.51 4765.52,3344 4743.52,3344
  region net M1_Iu: 4562.52,2939 4550.52,2951 4550.52,2998 4559.52,3007 4749.52,3007 4766.52,2990 4766.52,2941 4669.52,2941 4667.52,2939
  region net GND: 4284,3182.74 4284.09,3182.65 4307.26,3182.65 4307.26,3227.91 4307.17,3228 4284,3228
Bottom Layer:
  region net GND: 4735,3104 4755,3124 4806,3124 4892,3038 4892,2713 4738.84,2559.84 4690,2559.84 4690,2670 4696,2670 4794,2768 4794,3006 4735,3065
  region net I1_shunt: 4635,3404 4635,3296 4673,3296 4716,3253 4716,3198.11 4633,3115.11 4633,3039 4698,3039 4698,3104 4765,3171 4795,3171 4795,3353 4747,3353 4696,3404
  region net M1_Iv: 4651.52,3229 4626.52,3254 4619.52,3261 4559.52,3261 4550.52,3252 4550.52,3205 4565.52,3190 4583.52,3190 4695.52,3190 4695.52,3229
  region net M1_Iw: 4645.52,3470 4624.52,3449 4617.52,3442 4562.52,3442 4550.52,3454 4550.52,3501 4559.52,3510 4695.52,3510 4695.52,3470
  region net Vin: 4825.52,3304 4825.52,3352 4869.52,3352 4875.52,3346 4875.52,3289 4875.51,3240 4866.52,3231 4839.52,3231 4820.52,3231 4811.52,3240 4811.52,3290
  region net M1_Iu: 4651.52,2975 4626.52,3000 4619.52,3007 4559.52,3007 4550.52,2998 4550.52,2951 4565.52,2936 4583.52,2936 4695.52,2936 4695.52,2975

## Silkscreen, mask and mechanical layers (free items; w line width, h text height)
Top Overlay:
  lines w5: 3973.49,3562.22 4051.49,3562.22 ; 4012.13,3522.68 4012.13,3600.86 ; 4252.29,3561.17 4330.46,3561.17 ; 4290.93,3522.54 4290.93,3600.54 4290.93,3522.54
  text "W" at 5009,3253 h60
  text "V" at 5009,3100 h60
  text "TX" at 3652,3097 h40
  text "GND" at 3734,3097 h40
  text "U" at 5010,2952 h60
  text "GND" at 3530,2760 h50
  text "VIN" at 3685,2760 h50
  text "CH32M007E8U6_FAN_R0_1V0" at 4080,2560 h40
  text "YYYY" at 4649,2550 h3
Bottom Overlay:
  text "SWIO" at 3610,2856 h40 r90
  text "GND" at 3710,2856 h40 r90
  text "V5" at 3810,2856 h40 r90
Mechanical 1:
  lines w5: 3197.63,2594.97 ccw(c3250.64,2595) 3250.64,2541.99 5263.61,2542 ccw(c5263.61,2595) 5316.62,2595 5316.62,3682.24 ; 3197.63,2595 3197.63,3676.04 cw(c3250.64,3676.04) 3250.64,3729.05 5268.61,3729.05 cw(c5268.61,3681.04) 5316.62,3681.04 ; 5097.49,2655.17 ccw(c5156.55,2655.17) 5156.55,2596.12 ; 5097.49,2655.17 cw(c5156.55,2655.17) 5156.55,2714.23 ; 5097.49,2655.17 cw(c5156.55,2655.17) 5156.55,2714.23 ; 5097.49,2655.17 ccw(c5156.55,2655.17) 5156.55,2596.12 ; 5156.55,2596.12 ccw(c5156.55,2655.17) 5215.6,2655.17 ; 5156.55,2596.12 ccw(c5156.55,2655.17) 5215.6,2655.17 ; 5156.55,2714.23 cw(c5156.55,2655.17) 5215.6,2655.17 ; 5156.55,2714.23 cw(c5156.55,2655.17) 5215.6,2655.17 ; 3299.07,2655.17 ccw(c3358.12,2655.17) 3358.12,2596.12 ccw(c3358.12,2655.17) 3417.18,2655.17 ccw(c3358.12,2655.17) 3358.12,2714.23 ccw(c3358.12,2655.17) 3299.07,2655.17 ; 3299.07,3615.8 ccw(c3358.12,3615.8) 3358.12,3556.75 ccw(c3358.12,3615.8) 3417.18,3615.8 ccw(c3358.12,3615.8) 3358.12,3674.86 ccw(c3358.12,3615.8) 3299.07,3615.8 ; 5097.49,3615.8 ccw(c5156.55,3615.8) 5156.55,3556.75 ccw(c5156.55,3615.8) 5215.6,3615.8 ccw(c5156.55,3615.8) 5156.55,3674.86 ccw(c5156.55,3615.8) 5097.49,3615.8

## Text inside footprints (layer, text, board x,y; h text height)
B1: Bottom Overlay "+" at 3379.93,3168.42 h100 r180